# Altium PCB Karta_ILS.PCBDOC (part 7 of 9)
Units mm, origin at the board's own origin, x right, y up, seen from the top; angles counter-clockwise.
Board outline 70 x 83.2 mm, 6 copper layers (TopLayer, Layer 1, Layer 2, Layer 3, Layer 4, Bottom Layer), stack 0.914 mm thick; 406 components, 271 nets, 1327 pads, 719 vias.
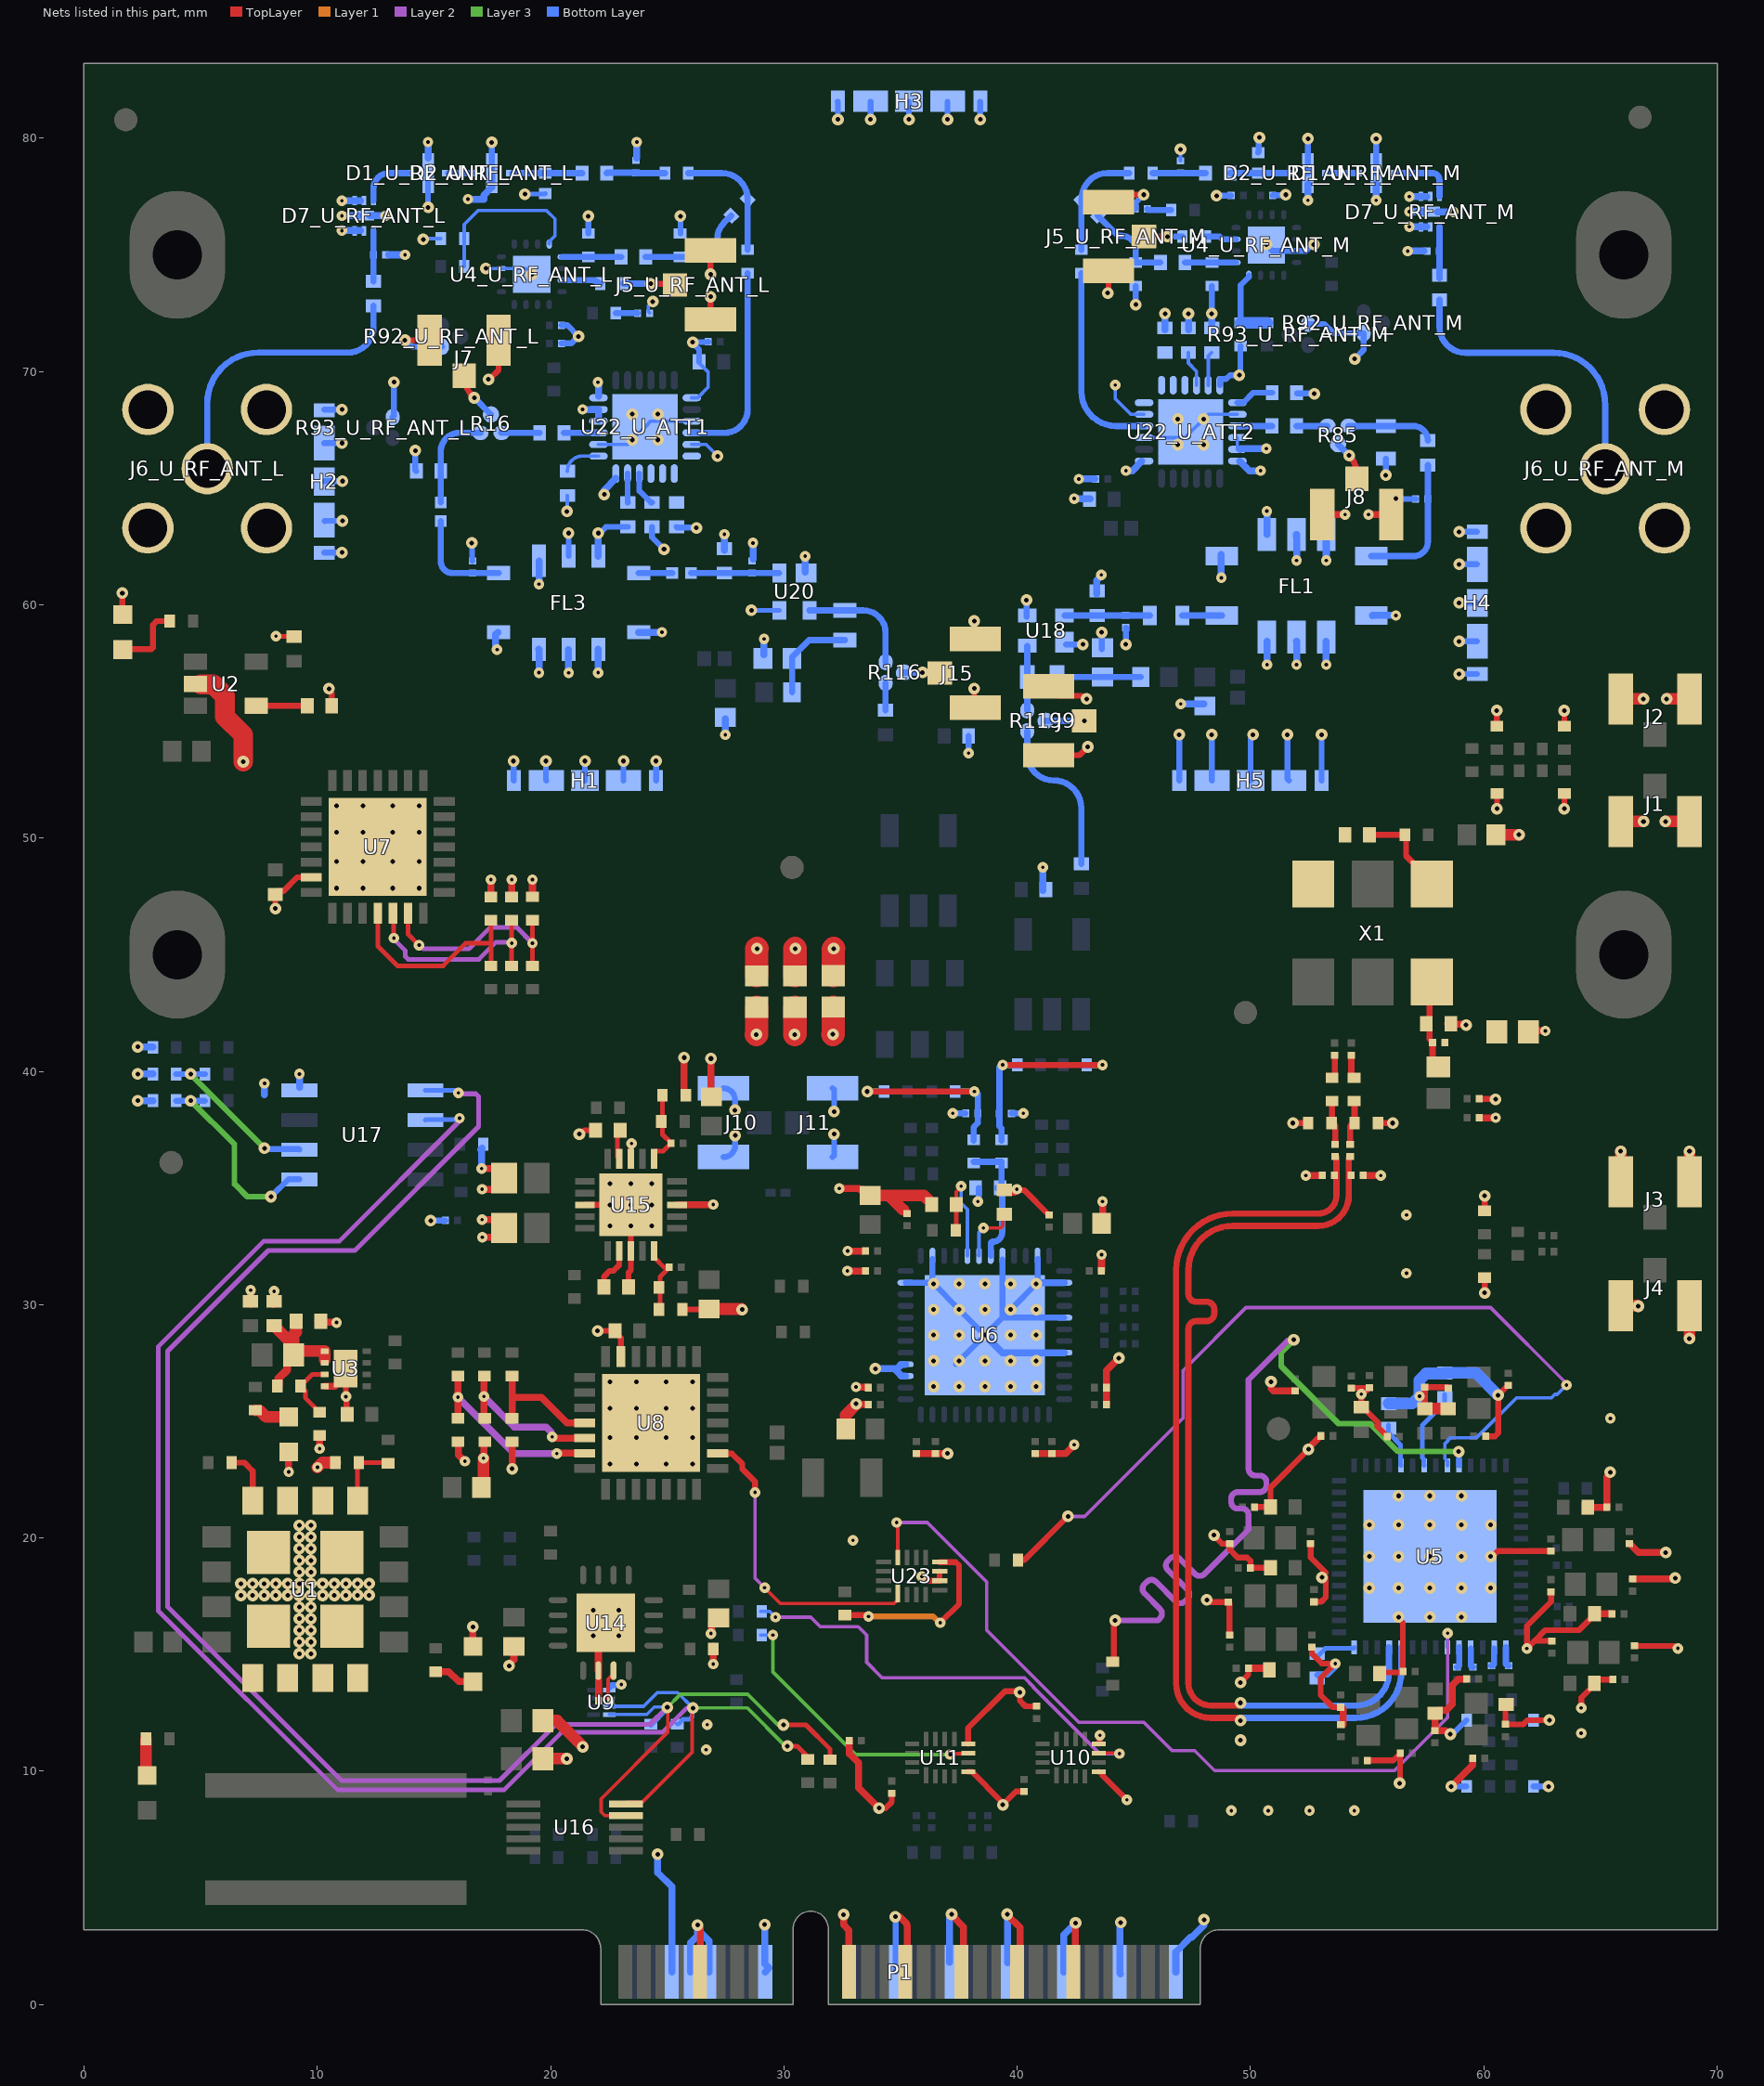
[diagram p8: the nets of this part, all layers, seen from the top]

## Via types
v1: diameter 0.5, hole 0.2, TopLayer to Bottom Layer, tented both sides, 456 vias
v2: diameter 0.45, hole 0.15, TopLayer to Bottom Layer, tented both sides, 237 vias
v3: diameter 0.45, hole 0.15, TopLayer to Bottom Layer, 23 vias
v4: diameter 0.5, hole 0.2, TopLayer to Bottom Layer, 3 vias

## Nets (pads, with @x,y where several pads share a name; then routed paths per layer and width w, separated by ;. In a path a pad name is that pad's centre, name@x,y a point inside that pad or via, vN(x,y) a via of type N, cw(c..) or ccw(c..) an arc to the next point about the centre after c; other vN are vias at no path point) (continued)
GND: C2.1 C6.1 C7.1 C8.1 C9.1 C14.2 C15.2 C35.1 C36.1 C37.1 C38.2 C39.2 C45.1 C62.1 C65.1 C66.1 C67.1 C68.1 C70.2 C71.2 C73.1 C74.1 C75.1 C76.1 C77.1 C78.1 C79.1 C80.1 C81.1 C82.1 C83.1 C84.1 C85.1 C86.1 C87.1 C88.1 C89.1 C90.1 C91.1 C92.2 C93.1 C94.1 C95.1 C96.1 C97.1 C98.1 C99.1 C100.1 C101.1 C102.1 C103.1 C104.1 C105.1 C106.1 C107.1 C108.1 C109.1 C110.1 C113.1 C114.1 C115.1 C116.1 C117.1 C118.1 C119.1 C120.1 C121.1 C122.1 C123.1 C124.1 C125.1 C126.1 C127.1 C128.1 C129.1 C131.1 C132.1 C133.1 C134.1 C135.1 C136.1 C137.1 C138.1 C139.1 C140.1 C141.1 C143.1 C144.1 C145.1 C146.1 C147.1 C148.1 C149.1 C150.1 C151.1 C152.1 C154.1 C179.1 D9.2 D12.2 FB15.2 FB30.2 FB31.2 FB32.1 FB33.1 FB34.1 J1.1 J1.3 J2.1 J2.3 J3.1 J3.3 J4.1 J4.3 J10.1 J10.3 J11.1 J11.3 P1.6 P1.8 P1.9 P1.10 P1.16 P1.17 P1.22 P1.23 P1.28 P1.29 P1.34 P1.35 P1.40 P1.41 P1.46 P1.52 R4.1 R7.1 R19.2 R23.1 R25.1 R26.1 R28.2 R29.2 R32.1 R33.1 R37.2 R38.2 R40.1 R42.2 R60.1 R61.1 R62.1 R72.1 R73.1 R74.1 R77.1 R79.1 R99.1 R101.1 R103.2 R114.1 R115.1 U1.5 U1.6 U1.7 U1.8 U1.14 U1.15 U1.EP U2.2 U3.4 U3.9 U5.57 U6.2 U6.8 U6.11 U6.14 U6.17 U6.20 U6.39 U6.40 U6.47 U6.49 U7.6 U7.29 U8.6 U8.29 U9.1 U10.5 U10.8 U11.5 U11.8 U14.6 U14.17 U15.3 U15.8 U15.13 U15.18 U15.21 U17.4 U23.6 U23.7 | length 256.4
  TopLayer w0.25: v1(8.203,46.982) C68.1@8.203,47.582 8.353,47.732 8.559,47.732 9.147,48.32 U7.6@9.744,48.32 ; U3.9@11.229,26.963 v2(11.229,26.059) 11.26,26.028 11.26,25.33 C6.1@11.29,25.299 ; v1(21.233,37.311) 21.3,37.311 21.465,37.475 C152.1@21.928,37.475 ; U15.3@21.47,34.279 v1(22.545,34.279) v1(23.445,34.279) v1(23.445,33.379) U15.8@23.445,32.304 23.445,31.482 23.341,31.377 C151.1@23.341,30.764 ; v1(22.016,28.876) C67.1@22.76,28.876 22.76,28.826 23.01,28.576 U8.6@23.01,27.779 ; U15.18@23.445,36.254 23.445,36.882 v2(23.47,36.906) ; R103.2@25.646,29.791 26.764,29.791 C141.1@26.788,29.815 ; v1(34.08,8.417) 34.36,8.417 34.625,8.683 C14.2@34.625,9.059 ; v2(35.913,18.348) 35.967,18.348 36.15,18.164 U23.6@36.677,18.164 U23.7@36.677,18.564 ; U11.5@37.9,9.979 38.05,9.979 39.334,8.695 39.334,8.61 39.429,8.61 39.949,9.13 C70.2@40.287,9.13 ; U11.8@37.9,11.179 37.9,11.85 39.479,13.429 40.111,13.429 40.111,13.026 40.353,12.784 C71.2@40.84,12.784 ; C74.1@39.449,34.785 39.819,34.785 ccw(c39.819,34.947) v2(39.981,34.947) 40.019,34.909 40.296,34.909 41.357,33.848 C77.1@41.367,33.848 ; U10.5@43.495,9.979 43.52,9.954 43.67,9.954 43.67,9.804 44.699,8.776 v2(44.702,8.776) ; U10.8@43.497,11.179 43.522,11.204 43.522,11.513 v2(43.548,11.539) ; v1(48.131,17.346) 48.199,17.346 48.295,17.25 C125.1@49.053,17.25 49.063,17.25 49.099,17.214 C118.1@49.099,15.836 ; v1(48.437,20.118) 48.437,20.089 48.777,19.749 C135.1@49.112,19.749 49.112,19.499 49.447,19.164 49.853,19.164 49.999,19.018 C126.1@49.999,18.718 C128.1@50.858,18.718 ; v1(49.57,13.806) 49.907,14.142 C117.1@49.907,14.414 ; C136.1@50.174,21.323 C138.1@50.863,21.323 50.863,22.174 v1(52.488,23.8) ; v1(51.817,37.783) R19.2@52.462,37.783 ; C137.1@52.576,19.749 52.576,19.16 53.23,18.506 53.064,18.341 v1(53.064,18.312) ; C119.1@52.634,15.316 52.634,15.032 53.05,14.616 v2(53.632,14.616) 53.006,13.989 53.006,13.262 53.526,12.742 C99.1@53.864,12.742 ; C127.1@52.719,17.259 53.028,17.259 53.23,17.461 v1@53.23,18.312 ; C106.1@54.314,26.428 54.319,26.432 C102.1@55.077,26.432 ; C97.1@55.015,10.461 56.126,10.461 C148.1@56.408,10.743 ; C102.1@55.091,26.436 55.081,26.436 C102.1@55.077,26.432 ; R23.1@55.452,37.783 R23.1@55.463,37.783 v1(56.097,37.783) ; C100.1@55.64,14.29 55.64,14.288 55.69,14.238 56.509,14.238 56.534,14.263 C149.1@56.534,14.273 56.534,16.347 56.343,16.539 v1(56.343,16.606) ; C103.1@55.864,24.342 55.864,24.352 55.44,24.776 55.44,24.966 54.804,25.603 C108.1@54.754,25.603 54.754,26.109 C102.1@55.077,26.432 ; v1(56.391,9.485) 56.408,9.502 C148.1@56.408,10.743 ; C148.1@56.424,10.769 56.408,10.753 C148.1@56.408,10.743 ; C104.1@57.471,25.54 C101.1@57.471,26.457 58.447,26.457 58.474,26.429 C94.1@58.484,26.429 ; C110.1@59.798,38.836 59.816,38.818 60.489,38.818 v1(60.507,38.8) ; v1(60.037,30.508) R42.2@60.037,31.153 ; R40.1@60.037,34.016 v1(60.037,34.662) ; C95.1@60.086,24.355 60.474,24.355 60.62,24.501 60.62,26.117 v1(60.615,26.122) 61.029,26.536 C93.1@61.039,26.536 ; v1(60.293,19.206) 60.36,19.206 60.594,19.44 C123.1@62.884,19.44 ; R29.2@60.556,54.822 v1(60.556,55.467) ; v1(60.567,51.255) R26.1@60.567,51.9 ; C116.1@60.962,12.865 60.93,12.834 C113.1@60.93,12.008 61.694,12.008 61.874,12.189 v1(62.812,12.189) ; C133.1@62.884,17.694 62.884,17.274 61.847,16.237 v2(61.847,15.259) 62.172,15.584 62.173,15.584 ; C145.1@62.911,15.584 62.173,15.584 ; v1(63.451,51.255) R25.1@63.451,51.9 ; R28.2@63.451,54.815 v1(63.451,55.46) ; v2(64.175,12.714) 64.175,13.151 64.737,13.713 C146.1@64.737,13.763 64.737,13.782 64.887,13.932 C144.1@65.528,13.932 ; C134.1@64.744,16.751 64.744,16.701 64.091,16.048 62.637,16.048 62.173,15.584 ; C143.1@66.457,15.373 68.157,15.373 68.265,15.265 v2(68.319,15.265)
  TopLayer w0.3: C9.1@7.134,30.01 7.14,30.015 7.14,30.615 v2(7.145,30.621) ; C8.1@8.152,30.01 v2@8.152,30.574 ; v2(8.776,22.829) D12.2@8.776,23.689 ; C7.1@10.016,29.282 10.045,29.252 10.809,29.252 v2(10.828,29.233) ; v2(10.102,23.827) R7.1@10.102,24.389 R7.1@10.102,24.439 ; U3.4@10.316,26.507 10.758,26.507 10.858,26.607 10.866,26.607 11.216,26.957 U3.9@11.216,27.257 ; R74.1@16.047,24.102 16.047,23.566 v2(16.324,23.289) ; D9.2@16.674,15.344 v1(16.674,16.194) ; v2(17.041,35.829) C140.1@17.605,35.829 ; v2(17.061,33.648) C139.1@17.625,33.647 ; v2@17.061,34.946 C140.1@17.625,34.946 ; v2(17.074,32.886) C139.1@17.638,32.885 ; v2(17.12,23.414) 17.148,23.443 17.148,24.073 R73.1@17.184,24.108 ; R60.1@17.445,47.425 R60.1@17.445,47.475 v2(17.445,48.222) ; v1(18.227,14.52) 18.227,14.574 18.427,14.774 C91.1@18.427,15.354 ; R61.1@18.334,47.425 R61.1@18.334,47.475 v2(18.334,48.222) ; v1@18.35,22.968 R72.1@18.35,24.122 ; R62.1@19.223,47.425 R62.1@19.223,47.482 v2(19.223,48.222) ; C92.2@22.063,13.023 22.063,14.294 U14.6@22.048,14.309 22.048,16.034 U14.17@22.373,16.359 ; U15.13@25.42,34.279 25.425,34.284 26.965,34.284 v2(26.969,34.288) ; v1(25.725,40.588) 25.725,39.049 R101.1@25.795,38.978 ; v1(26.298,3.409) 26.423,3.285 26.423,1.423 P1.9@26.4,1.4 ; v2(26.873,15.901) 26.873,15.942 26.903,15.972 26.903,16.353 C75.1@27.194,16.644 ; v1(26.873,40.548) 26.873,38.919 C129.1@26.892,38.9 ; v2(26.969,14.592) R99.1@26.969,15.353 ; v2(32.371,34.976) 33.224,34.976 33.272,34.928 33.405,34.928 33.571,34.762 C87.1@33.571,34.629 ; v1(32.557,3.855) 32.557,3.417 32.786,3.187 P1.17@32.786,1.4 ; v2(32.721,31.442) C84.1@33.407,31.442 ; v2(32.732,32.3) C79.1@33.418,32.3 ; C15.2@32.807,11.319 32.807,10.754 33.199,10.361 33.199,9.298 v1(34.08,8.417) ; v2(33.088,26.474) 33.109,26.452 33.609,26.452 C83.1@33.609,26.442 ; v1@33.114,25.733 33.609,25.733 C81.1@33.609,25.723 ; v1(34.774,3.76) 34.971,3.76 35.253,3.478 cw(c34.981,3.353) 35.281,3.353 P1.23@35.281,1.407 ; C90.1@35.677,23.617 C179.1@36.492,23.617 v1(37.012,23.617) ; v1(37.191,3.869) 37.191,3.832 37.693,3.33 P1.29@37.693,1.408 ; v1(39.569,3.868) 39.569,3.848 40.12,3.298 P1.35@40.12,1.415 ; C89.1@40.779,23.617 C88.1@41.492,23.617 42.07,23.617 v2(42.445,23.992) ; P1.41@42.488,1.422 42.488,3.479 v1(42.502,3.493) ; C78.1@43.616,31.444 v2(43.616,32.139) ; C76.1@43.658,33.532 v2(43.658,34.419) ; C80.1@43.832,25.723 C85.1@43.832,26.442 43.832,27.178 v1(44.362,27.708) ; C117.1@49.907,14.414 C120.1@50.669,14.414 ; C120.1@50.809,14.294 C120.1@50.809,14.344 ; v1(50.879,26.696) 50.896,26.678 50.896,26.4 50.996,26.301 C105.1@51.913,26.301 ; v2(52.375,35.536) C39.2@53.073,35.536 ; v1(52.488,23.8) 52.488,23.845 53.006,24.362 53.016,24.362 C107.1@53.016,24.372 ; C98.1@53.978,11.994 C99.1@53.978,12.674 ; C45.1@54.833,35.536 v2(55.584,35.536) ; v1(58.561,11.589) 58.507,11.589 58.351,11.745 C147.1@57.909,11.745 C150.1@57.909,12.481 58.034,12.606 58.384,12.606 58.644,12.867 58.644,13.683 58.911,13.95 C115.1@59.257,13.95 ; v1(58.605,9.347) 59.517,10.259 C114.1@59.517,10.557 ; C109.1@59.821,38.01 v2(60.507,38.01) ; FB15.2@61.95,41.735 v2(62.636,41.735) ; C124.1@64.456,21.317 C121.1@65.278,21.317 ; C134.1@64.744,16.751 C131.1@65.489,16.751 ; C121.1@65.278,21.31 C121.1@65.278,21.317 ; v1(65.422,22.819) 65.422,22.765 65.278,22.621 C121.1@65.278,21.317 ; C122.1@66.24,19.749 66.25,19.749 66.622,19.378 v1(67.8,19.378) ; C132.1@66.373,18.237 68.165,18.237 v1(68.208,18.28)
  TopLayer w0.5: v2(10.008,23.026) 10.211,23.229 R4.1@10.778,23.229 ; C2.1@17.028,22.166 17.12,22.257 v2(17.12,23.414) ; FB30.2@19.675,10.536 20.693,10.536 v1(20.696,10.533) ; FB31.2@19.675,12.167 20.278,12.167 21.376,11.069 v1(21.376,11.05) ; C141.1@26.788,29.815 28.192,29.815 v1(28.215,29.792) ; C86.1@32.649,24.663 32.649,25.268 v1@33.114,25.733 ; C87.1@33.705,34.678 34.508,34.678 ; 35.129,34.057 34.508,34.678 ; C73.1@36.338,34.288 36.313,34.313 36.313,34.363 35.997,34.679 34.509,34.679 ; C104.1@57.471,25.54 C96.1@58.473,25.54 ; C38.2@60.519,50.14 v1(61.509,50.14) ; J4.3@65.865,29.953 66.597,29.953 v1(66.617,29.933) ; J3.1@65.866,34.77 v1@65.866,36.572 ; J2.1@65.953,55.96 v1(66.84,55.96) ; J1.3@65.959,50.708 v1(66.846,50.708) ; v1(67.789,50.708) J1.1@68.677,50.708 ; v1(67.838,55.96) J2.3@68.725,55.96 ; v1(68.815,28.544) J4.1@68.815,29.952 ; J3.3@68.815,34.77 v1(68.815,36.572)
  TopLayer w0.85: U2.2@5.014,56.589 5.016,56.587 5.546,56.587 6.044,56.089 6.044,55.205 6.826,54.422 v1(6.826,53.271)
  TopLayer w1: v1(28.821,41.577) 28.836,41.591 FB34.1@28.836,42.745 ; v1(30.462,41.577) 30.476,41.591 FB33.1@30.476,42.745 ; v1(32.099,41.584) 32.114,41.598 FB32.1@32.114,42.752
  Bottom Layer w0.25: v1(14.858,33.603) 14.861,33.606 15.485,33.606 C154.1@15.488,33.609 ; U9.1@22.514,13.57 22.629,13.685 22.997,13.685 v2(23.029,13.716) ; J10.3@27.415,36.325 ccw(c27.415,36.82) 27.91,36.82 v1(27.91,37.25) ; J10.1@27.415,39.275 cw(c27.415,38.787) 27.903,38.787 v1(27.903,38.335) ; J11.1@32.088,36.325 32.153,36.39 v1(32.153,37.311) ; J11.3@32.088,39.275 32.153,39.21 v1(32.153,38.273) ; v1(34.774,3.76) 34.787,3.747 34.787,1.413 P1.22@34.8,1.4 ; U6.47@35.217,30.942 U6.49@36.367,30.942 ; U6.2@36.367,31.967 U6.49@36.367,30.942 ; v2(37.236,38.198) C62.1@37.791,38.198 ; U6.49@37.367,27.442 v1(37.517,27.592) v1(38.617,28.692) ; v2(38.318,34.419) ccw(c38.318,34.454) 38.353,34.454 C65.1@38.353,35.004 ; U6.8@39.367,31.93 U6.49@39.367,29.442 ; C66.1@39.757,38.196 39.759,38.198 40.263,38.198 v2(40.265,38.2) ; U6.11@40.88,31.96 40.88,30.955 v1(39.717,29.792) U6.49@39.367,29.442 ; U6.17@42.017,29.442 U6.49@39.367,29.442 ; C35.1@52.861,14.129 52.876,14.144 53.305,14.144 53.632,14.471 v2(53.632,14.616) ; v1(58.605,9.347) R37.2@59.251,9.347 ; v1@58.736,11.665 R38.2@59.26,12.189 ; R32.1@62.13,9.347 v1(62.776,9.347) ; R33.1@62.166,12.189 v1(62.812,12.189) ; U6.49@36.367,30.942 v1(36.417,30.892) v1(37.517,29.792) v1(38.617,28.692) ; v1(38.617,28.692) U6.49@39.367,29.442
  Bottom Layer w0.3: v1(2.303,38.743) R77.1@2.954,38.743 ; v1(2.303,39.886) R79.1@2.954,39.886 ; v1(2.303,41.055) R114.1@2.954,41.055 ; 7.739,38.995 v2(7.739,39.484) ; U17.4@9.237,39.322 v2(9.237,39.886) ; v2(17.041,35.829) 17.041,36.612 17.007,36.647 R115.1@17.06,36.7 ; v1(24.59,6.444) 24.59,5.659 25.2,5.049 P1.6@25.2,1.4 ; P1.8@26,1.4 26,2.638 26.298,2.936 v1(26.298,3.409) 26.298,3.23 26.8,2.728 P1.10@26.8,1.4 ; v1(29.177,3.423) 29.177,1.755 29.366,1.566 P1.16@29.2,1.4 ; v1(33.919,27.257) 34.728,27.257 ; U6.39@35.217,26.942 35.042,26.942 34.728,27.257 ; U6.40@35.217,27.442 35.042,27.442 34.856,27.257 34.728,27.257 ; P1.28@37.107,1.803 37.107,3.785 v1(37.191,3.869) ; v1(38.617,28.692) 39.367,27.942 U6.20@42.017,27.942 ; v1(39.569,3.868) 39.583,3.854 P1.34@39.583,1.796 ; U6.49@40.892,30.942 U6.14@42.017,30.942 ; P1.40@42,1.4 42,2.991 v1(42.502,3.493) ; P1.46@44.427,1.32 44.403,1.344 44.403,3.476 v1(44.439,3.512) ; P1.52@46.8,1.4 46.8,2.25 47.433,2.883 47.481,2.883 48.006,3.408 v1(48.006,3.632)
  Bottom Layer w0.5: C37.1@55.918,25.757 56.929,25.757 v2(57.244,26.071) 57.244,26.768 57.524,27.048 58.349,27.048 C36.1@58.326,27.072 59.665,27.072 v1(60.615,26.122)
  other v1: 39.381,8.563 49.573,11.329 40.111,13.381 9.228,15.038 9.728,15.038 9.228,15.538 9.728,15.538 21.823,15.809 22.923,15.809 9.228,16.038 9.728,16.038 9.228,16.538 9.728,16.538 57.693,16.606 59.043,16.606 21.823,16.909 22.923,16.909 9.229,17.039 9.729,17.039 6.729,17.538 7.229,17.538 7.729,17.538 8.229,17.538 8.729,17.539 9.229,17.539 9.729,17.539 10.229,17.539 10.729,17.539 11.229,17.539 11.728,17.539 12.228,17.54 55.093,17.856 56.343,17.856 57.693,17.856 59.043,17.856 60.293,17.856 6.729,18.038 7.229,18.038 7.729,18.038 8.229,18.038 8.729,18.039 9.229,18.039 9.729,18.039 10.229,18.039 10.729,18.039 11.229,18.039 11.728,18.039 12.228,18.04 9.229,18.539 9.729,18.539 9.228,19.039 9.728,19.039 55.093,19.206 56.343,19.206 57.693,19.206 59.043,19.206 9.228,19.539 9.728,19.539 9.228,20.039 9.728,20.039 9.228,20.539 9.728,20.539 55.093,20.556 56.343,20.556 57.693,20.556 59.043,20.556 60.293,20.556 56.343,21.806 57.693,21.806 59.043,21.806 18.349,22.968 22.54,23.159 23.675,23.159 24.945,23.159 26.08,23.159 22.54,24.294 23.675,24.294 24.945,24.294 26.08,24.294 22.54,25.564 23.675,25.564 24.945,25.564 26.08,25.564 33.094,25.754 36.417,26.492 37.517,26.492 38.617,26.492 39.717,26.492 40.817,26.492 22.54,26.699 23.675,26.699 24.945,26.699 26.08,26.699 36.417,27.592 38.617,27.592 39.717,27.592 40.817,27.592 36.417,28.692 37.517,28.692 39.717,28.692 40.817,28.692 36.417,29.792 38.617,29.792 40.817,29.792 37.517,30.892 38.617,30.892 39.717,30.892 40.817,30.892 22.545,33.379 24.345,33.379 24.345,34.279 22.545,35.179 23.445,35.179 24.345,35.179 65.866,36.572 10.824,47.85 11.959,47.85 13.229,47.85 14.363,47.85 10.824,48.985 11.959,48.985 13.229,48.985 14.363,48.985 10.824,50.255 11.959,50.255 13.229,50.255 14.363,50.255 10.824,51.39 11.959,51.39 13.229,51.39 14.363,51.39
  other v2: 49.177,8.31 50.757,8.31 52.528,8.31 54.455,8.31 26.668,10.926 64.175,11.63 26.716,11.995 32.96,19.899 65.422,25.123 54.746,26.167 8.153,30.574 56.684,31.348 56.684,33.848 17.061,34.947
GND_ATT_U_ATT1: C4.1 C5.1 C11_U_RF_ANT_L.1 C11_U_RF_ANT_M.1 C12_U_RF_ANT_L.2 C12_U_RF_ANT_M.2 C13_U_RF_ANT_L.1 C13_U_RF_ANT_M.1 C48.1 C49.1 C156.2 C158.1 C161.2 C162.2 C163.1 C168.1 C169.1 C171.2 C172.2 C180_U_ATT1.1 C180_U_ATT2.1 C181_U_ATT1.1 C181_U_ATT2.1 C182_U_ATT1.2 C182_U_ATT2.2 C183_U_ATT1.2 C183_U_ATT2.2 C184_U_ATT1.2 C184_U_ATT2.2 C185_U_ATT1.2 C185_U_ATT2.2 C186_U_RF_ANT_L.1 C186_U_RF_ANT_M.1 C187_U_RF_ANT_L.1 C187_U_RF_ANT_M.1 C188.1 C190.1 D1_U_RF_ANT_L.2 D1_U_RF_ANT_M.2 D2_U_RF_ANT_L.2 D2_U_RF_ANT_M.2 D7_U_RF_ANT_L.2 D7_U_RF_ANT_L.3 D7_U_RF_ANT_L.4 D7_U_RF_ANT_L.5 D7_U_RF_ANT_L.7 D7_U_RF_ANT_M.2 D7_U_RF_ANT_M.3 D7_U_RF_ANT_M.4 D7_U_RF_ANT_M.5 D7_U_RF_ANT_M.7 D10.2 FB32.2 FB33.2 FB34.2 FL1.A FL1.B FL1.C FL1.E FL1.F FL1.G FL1.H FL1.K FL3.1 FL3.2 FL3.3 FL3.6 FL3.7 FL3.8 FL3.9 FL3.10 H1.1 H2.1 H3.1 H4.1 H5.1 J5_U_RF_ANT_L.1 J5_U_RF_ANT_L.3 J5_U_RF_ANT_M.1 J5_U_RF_ANT_M.3 J6_U_RF_ANT_L.MH J6_U_RF_ANT_M.MH J7.1 J7.3 J8.1 J8.3 J9.1 J9.3 J15.1 J15.3 L1_U_RF_ANT_L.1 L1_U_RF_ANT_M.1 L11.1 R80_U_RF_ANT_L.1 R80_U_RF_ANT_M.1 R83_U_RF_ANT_L.2 R83_U_RF_ANT_M.2 R89_U_RF_ANT_L.2 R89_U_RF_ANT_M.2 R92_U_RF_ANT_L.1 R92_U_RF_ANT_M.1 R93_U_RF_ANT_L.1 R93_U_RF_ANT_M.1 U4_U_RF_ANT_L.11 U4_U_RF_ANT_L.17 U4_U_RF_ANT_M.11 U4_U_RF_ANT_M.17 U18.2 U18.4 U20.2 U20.4 U22_U_ATT1.1 U22_U_ATT1.3 U22_U_ATT1.5 U22_U_ATT1.12 U22_U_ATT1.14 U22_U_ATT1.16 U22_U_ATT1.17 U22_U_ATT1.18 U22_U_ATT1.25 U22_U_ATT2.1 U22_U_ATT2.3 U22_U_ATT2.5 U22_U_ATT2.12 U22_U_ATT2.14 U22_U_ATT2.16 U22_U_ATT2.17 U22_U_ATT2.18 U22_U_ATT2.25 | length 149
  TopLayer w0.2: v2(8.226,58.65) 8.908,58.65 C4.1@9,58.559
  TopLayer w0.25: v1(1.644,60.5) 1.644,59.599 D10.2@1.664,59.578 ; v1(10.5,56.4) 10.5,56.332 10.621,56.212 C5.1@10.621,55.675 ; v1(13.758,71.338) J7.1@14.819,71.338 ; v1(17.34,69.66) 17.367,69.66 17.769,70.063 J7.3@17.769,71.338 ; J5_U_RF_ANT_L.3@26.855,72.233 v1(26.855,73.208) ; v1(26.855,74.164) J5_U_RF_ANT_L.1@26.855,75.183 ; J15.3@38.163,55.688 v1(38.163,56.41) ; J15.1@38.163,58.578 v1(38.163,59.3) ; J9.1@41.352,53.55 42.665,53.55 v1(43.025,53.91) ; J9.3@41.352,56.5 41.752,56.1 42.764,56.1 42.904,55.96 v1(42.971,55.96) ; v1@43.913,73.316 J5_U_RF_ANT_M.1@43.913,74.309 ; J5_U_RF_ANT_M.3@43.913,77.259 44.231,77.577 v1(45.418,77.577)
  TopLayer w0.3: J8.3@53.048,63.872 53.051,63.868 J8.3@53.084,63.868 v2(54.049,63.868) ; v2(55.059,63.868) J8.1@56.034,63.868 56.057,63.868 J8.1@56.06,63.865
  TopLayer w1: FB34.2@28.836,44.095 28.836,45.248 v1(28.85,45.263) ; FB33.2@30.476,44.095 30.476,45.25 v1(30.488,45.263) ; FB32.2@32.114,44.102 32.114,45.239 v1(32.137,45.263)
  Bottom Layer w0.15: v1(14.544,75.664) cw(c14.58,75.664) 14.58,75.7 R89_U_RF_ANT_L.2@15.294,75.7 ; v1(17.231,74.414) U4_U_RF_ANT_L.11@17.894,74.414 18.944,74.414 v1(19.194,74.164) ; v1(20.7,64) ccw(c20.7,64.019) 20.719,64.019 C182_U_ATT1.2@20.719,64.681 ; U22_U_ATT1.14@22.052,66.871 23.302,66.871 v1(23.502,67.071) U22_U_ATT1.25@24.052,67.621 24.302,67.871 U22_U_ATT1.3@26.052,67.871 ; C11_U_RF_ANT_L.1@24.251,72.5 24.191,72.56 24.191,72.807 v1(24.381,72.998) ; U22_U_ATT1.5@26.052,66.871 26.659,66.871 v1(27.159,66.371) ; U22_U_ATT1.1@26.052,68.871 26.302,68.871 26.75,69.32 26.75,69.986 26.37,70.366 C181_U_ATT1.1@26.37,70.416 ; v2(44.2,69.414) 44.2,68.832 44.87,68.162 U22_U_ATT2.5@45.438,68.162 ; U22_U_ATT2.3@45.438,67.162 47.188,67.162 U22_U_ATT2.25@47.438,67.412 v1(47.988,67.962) 48.188,68.162 U22_U_ATT2.14@49.438,68.162 ; C187_U_RF_ANT_M.1@47,79.025 v1(47,79.524) ; U22_U_ATT2.17@49.438,66.662 U22_U_ATT2.16@49.438,67.162
  Bottom Layer w0.2: v1(18.9,77.6) 18.912,77.612 19.761,77.612 L1_U_RF_ANT_L.1@19.774,77.625 ; v1(28.613,59.76) U20.4@29.8,59.76 ; C162.2@43.658,58.156 C162.2@43.664,58.162
  Bottom Layer w0.25: H2.1@10.3,62.231 10.303,62.234 11.06,62.234 v1(11.062,62.237) ; H2.1@10.3,66.925 10.303,66.928 11.06,66.928 v1(11.062,66.931) ; H2.1@10.3,68.365 10.303,68.368 11.06,68.368 v1(11.062,68.371) ; H2.1@10.315,63.594 10.318,63.597 11.074,63.597 v1(11.077,63.6) ; H2.1@10.315,65.294 10.318,65.297 11.074,65.297 v1(11.077,65.3) ; R93_U_RF_ANT_L.1@13.229,68.043 13.286,68.101 v1(13.286,69.541) ; v1(13.758,71.338) 13.805,71.338 14.082,71.061 R92_U_RF_ANT_L.1@15.35,71.061 ; v1(14.2,66.609) 14.2,65.776 C48.1@14.244,65.731 ; v1(14.75,77.033) D1_U_RF_ANT_L.2@14.75,78.505 ; v1(16.621,62.648) 16.636,62.633 16.636,61.895 C190.1@16.651,61.88 ; D2_U_RF_ANT_L.2@17.481,78.505 v1(17.481,79.818) ; v1(18.416,53.303) 18.416,52.479 H1.1@18.423,52.472 ; v1(19.799,53.303) 19.799,52.496 H1.1@19.823,52.472 ; C13_U_RF_ANT_L.1@20.464,71.205 20.894,71.205 21.189,71.5 21.189,71.511 20.718,71.982 C12_U_RF_ANT_L.2@20.464,71.982 ; FL3.2@20.773,62.09 v1(20.773,63.071) ; H1.1@21.473,52.472 v1(21.473,53.303) ; R83_U_RF_ANT_L.2@21.619,75.914 v1(21.619,76.658) ; v1(22.043,63.071) 22.11,63.071 22.376,63.337 C183_U_ATT1.2@23.307,63.337 ; H1.1@23.123,52.472 23.125,52.474 v1(23.125,53.303) ; C184_U_ATT1.2@24.35,63.337 24.35,62.892 v1(24.864,62.378) ; v1(24.521,53.303) 24.522,53.302 24.522,52.473 H1.1@24.523,52.472 ; C185_U_ATT1.2@25.4,63.337 25.423,63.314 26.232,63.314 v1(26.255,63.291) ; R80_U_RF_ANT_L.1@25.568,75.914 v1(25.568,76.658) ; C181_U_ATT1.1@26.37,70.416 26.37,70.93 26.095,71.205 v1(26.095,71.256) 26.103,71.263 26.743,71.263 C180_U_ATT1.1@26.75,71.271 ; H3.1@32.309,81.57 32.312,81.567 32.312,80.81 v1(32.315,80.808) ; H3.1@33.709,81.57 33.712,81.567 33.712,80.81 v1(33.715,80.808) ; H3.1@35.359,81.57 35.362,81.567 35.362,80.81 v1(35.365,80.808) ; H3.1@37.009,81.57 37.012,81.567 37.012,80.81 v1(37.015,80.808) ; v2(37.913,53.639) 37.915,53.641 C156.2@37.915,54.372 ; H3.1@38.409,81.57 38.412,81.567 38.412,80.81 v1(38.415,80.808) ; U18.4@40.4,59.478 v1(40.4,60.2) ; U18.2@42.091,58.3 v1(42.813,58.3) ; C162.2@43.622,58.098 v1(43.622,58.82) ; v1(44.659,58.3) C169.1@44.659,59.022 ; C11_U_RF_ANT_M.1@45.059,76.962 45.084,76.987 45.084,77.243 v1(45.418,77.577) ; v1(45.082,72.864) R80_U_RF_ANT_M.1@45.082,73.669 ; v1(46.944,54.435) 46.947,54.432 46.947,52.475 H5.1@46.95,52.472 ; v1(48.338,54.435) 48.338,52.484 H5.1@48.35,52.472 ; v1(48.338,72.476) 48.344,72.482 48.344,73.663 R83_U_RF_ANT_M.2@48.35,73.669 ; v1(48.543,77.534) 48.548,77.539 49.163,77.539 C13_U_RF_ANT_M.1@49.168,77.544 ; U22_U_ATT2.12@48.688,69.412 48.688,69.649 48.711,69.672 48.948,69.672 49.113,69.837 v1(49.519,69.837) 49.562,69.881 49.562,71.072 R89_U_RF_ANT_M.2@49.578,71.088 ; H5.1@50,52.472 50,54.258 50.109,54.367 v1(50.109,54.435) ; L1_U_RF_ANT_M.1@50.324,79.385 50.353,79.414 50.353,79.999 v1(50.382,80.028) ; U4_U_RF_ANT_M.17@50.678,75.419 50.928,75.169 U4_U_RF_ANT_M.11@51.978,75.169 52.387,75.169 52.662,75.444 v1(52.713,75.444) ; C12_U_RF_ANT_M.2@50.949,77.544 50.965,77.56 51.491,77.56 v1(51.507,77.577) ; v1(51.583,54.435) 51.583,52.539 H5.1@51.65,52.472 ; C182_U_ATT2.2@51.991,69.056 v1@52.713,69.056 ; R93_U_RF_ANT_M.1@52.463,72.038 53.165,72.038 53.565,71.638 R92_U_RF_ANT_M.1@54.848,71.638 54.848,70.922 v1(54.465,70.538) ; D2_U_RF_ANT_M.2@52.463,78.505 v1(52.463,79.977) ; v1(53.048,54.435) v1(53.048,54.435) 53.049,52.473 H5.1@53.05,52.472 ; D1_U_RF_ANT_M.2@55.386,78.505 v1(55.386,79.977) ; v1(55.795,65.557) 55.8,65.562 L11.1@55.8,66.265 ; v1(56.229,64.55) ccw(c56.278,64.598) 56.278,64.53 C163.1@57.08,64.53 ; v1(58.945,57.03) 58.948,57.033 59.704,57.033 H4.1@59.707,57.036 ; v1(58.945,58.43) 58.948,58.433 59.704,58.433 H4.1@59.707,58.436 ; v1(58.945,60.08) 58.948,60.083 59.704,60.083 H4.1@59.707,60.086 ; v1(58.945,61.73) 58.948,61.733 59.704,61.733 H4.1@59.707,61.736 ; v1(58.945,63.13) 58.948,63.133 59.704,63.133 H4.1@59.707,63.136
  Bottom Layer w0.3: v2(11.059,76.04) 11.859,76.04 ; v2(11.059,76.674) D7_U_RF_ANT_L.7@11.746,76.674 ; v2(11.059,77.315) 11.852,77.315 ; D7_U_RF_ANT_L.7@12.242,76.674 v2(12.928,76.674) ; C186_U_RF_ANT_L.1@13.071,75 v2(13.758,75) ; D1_U_RF_ANT_L.2@14.75,79.146 v2(14.75,79.833) ; v2(16.455,77.385) 17.141,77.385 17.141,77.565 17.481,77.905 D2_U_RF_ANT_L.2@17.481,78.505 ; v2(17.706,58.081) 17.706,58.121 17.647,58.181 17.647,58.724 FL3.10@17.737,58.814 ; FL3.9@19.499,58.09 19.503,58.086 v2(19.503,57.089) ; v2(19.503,60.881) FL3.1@19.503,61.879 ; FL3.8@20.769,58.084 20.773,58.081 v2(20.773,57.083) ; v2(21.372,68.371) U22_U_ATT1.17@22.052,68.371 U22_U_ATT1.16@22.052,67.905 ; v2(22.031,69.541) 22.052,69.541 U22_U_ATT1.18@22.052,68.935 ; FL3.7@22.039,58.09 22.043,58.086 v2(22.043,57.089) ; v1(22.043,63.071) FL3.3@22.043,62.09 22.043,62.073 FL3.3@22.046,62.07 ; v1(22.302,64.728) 22.302,64.911 U22_U_ATT1.12@22.802,65.411 ; C187_U_RF_ANT_L.1@23.695,79.146 v2(23.695,79.833) ; FL3.6@23.771,58.817 23.775,58.82 v2(24.773,58.82) ; C49.1@27.45,62.336 v2(27.45,63.022) ; v2(27.491,54.425) C171.2@27.491,55.112 ; C188.1@28.676,61.962 v2(28.676,62.648) ; C172.2@29.15,57.851 v2(29.15,58.537) ; U20.2@30.911,61.396 v2(30.911,62.082) ; C158.1@41.097,47.745 v2(41.097,48.743) ; v2(42.44,64.55) C181_U_ATT2.1@43.126,64.55 ; v2(42.64,65.393) C180_U_ATT2.1@43.326,65.393 ; C168.1@43.415,60.476 43.415,61.045 43.609,61.239 v2(43.609,61.28) ; v2(44.659,65.745) 44.944,65.745 U22_U_ATT2.1@45.345,66.147 ; C185_U_ATT2.2@46.338,71.79 C185_U_ATT2.2@46.338,71.863 v1(46.338,72.476) ; v2(47.008,55.751) C161.2@48.006,55.751 ; C184_U_ATT2.2@47.338,71.79 C184_U_ATT2.2@47.338,71.863 v1(47.338,72.476) ; C183_U_ATT2.2@48.338,71.79 C183_U_ATT2.2@48.338,71.863 v1(48.338,72.476) ; v2(48.747,61.157) FL1.E@48.747,62.155 ; U22_U_ATT2.18@49.534,66.162 49.951,65.745 v2(50.429,65.745) ; U22_U_ATT2.17@49.558,66.662 49.589,66.694 v2(50.683,66.694) ; v2(50.703,64.012) 50.703,63.014 FL1.F@50.707,63.011 ; FL1.C@50.705,58.435 50.708,58.432 v2(50.708,57.434) ; FL1.B@51.972,58.435 51.975,58.432 v2(51.975,57.434) ; FL1.G@51.972,62.901 51.975,62.898 v2(51.975,61.9) ; FL1.G@51.973,63.014 FL1.G@51.977,63.011 ; v2(52.463,77.34) D2_U_RF_ANT_M.2@52.463,78.026 ; FL1.A@53.239,58.435 53.243,58.432 v2(53.243,57.434) ; FL1.H@53.244,62.901 53.247,62.898 v2(53.247,61.9) ; FL1.H@53.243,63.014 FL1.H@53.247,63.011 ; FL1.K@55.228,59.539 55.231,59.542 v2(56.229,59.542) ; v2(55.386,77.34) D1_U_RF_ANT_M.2@55.386,78.026 ; v2(56.743,75.16) 57.429,75.16 ; v2(56.805,76.2) D7_U_RF_ANT_M.3@57.3,76.2 57.551,76.2 ; v2(56.805,76.85) D7_U_RF_ANT_M.7@57.491,76.85 ; v2(56.805,77.5) D7_U_RF_ANT_M.4@57.3,77.5 57.551,77.5 ; D7_U_RF_ANT_M.7@58.014,76.837 v2(58.7,76.837)
  other v1: 46.888,66.862 47.988,66.862 24.602,67.071 46.888,67.962 23.502,68.171 24.602,68.171 52.738,69.045 21.2,71.5 43.878,73.364 50.683,75.444
GND_VCXO: C42.1 C111.1 C112.1 FB15.1 X1.3 | length 0.8
  TopLayer w0.3: C112.1@58.453,42.044 58.483,42.014 59.214,42.014 v1(59.244,41.984)
I2C_SCL: R66.1 R71.2 U9.3 U16.5 U17.6 | length 74.3
  TopLayer w0.15: U16.5@23.227,8.594 23.302,8.669 23.924,8.669 26.069,10.814 26.069,12.68 v1(26.099,12.711)
  TopLayer w0.2: v1(30.156,11.077) 30.568,11.077 31.025,10.62 R71.2@31.025,10.454
  Layer 2 w0.2: v2(16.101,37.991) 16.101,37.871 10.953,32.724 7.71,32.724 3.181,28.195 3.181,16.885 10.871,9.195 18,9.195 20.465,11.66 24.79,11.66 25.842,12.711 v1(26.099,12.711)
  Layer 3 w0.15: v1(26.099,12.711) 28.429,12.711 30.064,11.077 v1(30.156,11.077)
  Bottom Layer w0.15: U9.3@22.514,12.781 23.988,12.781 24.573,13.366 25.444,13.366 26.069,12.742 26.069,12.711 v1(26.099,12.711)
  Bottom Layer w0.2: U17.6@14.637,37.914 14.654,37.931 16.101,37.931 v2(16.101,37.991) ; R66.1@25.429,12.019 25.479,12.019 25.679,12.219 25.951,12.219 26.069,12.337 v1@26.069,12.711
I2C_SDA: R65.1 R70.2 U9.4 U16.4 U17.5 | length 77.1
  TopLayer w0.15: U16.4@23.227,8.094 22.327,8.094 22.167,8.254 22.167,8.815 25.019,11.666 25.019,12.719 v1(25.003,12.735)
  TopLayer w0.2: v1(29.982,11.986) 30.943,11.986 31.982,10.947 R70.2@31.982,10.441
  Layer 2 w0.2: v2(16.054,39.074) 16.092,39.036 16.799,39.036 16.916,38.919 16.916,37.63 11.61,32.324 7.9,32.324 3.581,28.005 3.581,17.05 11.035,9.597 17.814,9.597 20.227,12.01 24.256,12.01 24.982,12.735 v1(25.003,12.735)
  Layer 3 w0.15: v1(25.003,12.735) 25.564,13.296 28.443,13.296 29.753,11.986 v1(29.982,11.986)
  Bottom Layer w0.15: U9.4@22.514,12.431 24.126,12.431 24.445,12.751 v1@25.019,12.751
  Bottom Layer w0.2: U17.5@14.637,39.184 14.639,39.181 16.088,39.181 16.088,39.109 v2(16.054,39.074) ; R65.1@24.3,11.969 25.003,12.673 v1(25.003,12.735)
LMK_CLKin0_N: C46.1 U5.33 | length 0.9
  Bottom Layer w0.267: C46.1@58.847,14.465 ccw(c58.847,14.56) 58.943,14.56 U5.33@58.943,15.306
LMK_CLKin0_P: C47.1 U5.32 | length 0.8
  Bottom Layer w0.267: U5.32@59.443,15.247 59.443,14.56 ccw(c59.538,14.56) C47.1@59.538,14.465
LMK_CLKin1_N: C59.1 U5.30 | length 0.8
  Bottom Layer w0.267: C59.1@60.323,14.519 ccw(c60.323,14.639) 60.443,14.639 U5.30@60.443,15.247
LMK_CLKin1_P: C54.1 U5.29 | length 0.9
  Bottom Layer w0.267: U5.29@60.943,15.306 60.943,14.639 ccw(c61.063,14.639) C54.1@61.063,14.519
LMK_CLKsel: U5.34 U23.12 | length 35.9
  TopLayer w0.15: v2(34.831,20.66) 34.877,20.615 U23.12@34.877,19.164
  Layer 2 w0.15: v2(34.831,20.66) 36.144,20.66 38.693,18.111 38.693,16.051 42.645,12.099 45.43,12.099 46.644,10.885 47.603,10.885 48.46,10.028 56.173,10.028 58.448,12.303 v2(58.448,15.913)
  Bottom Layer w0.15: U5.34@58.443,15.306 58.429,15.32 58.429,15.893 v2(58.448,15.913)
LMK_CLKsel_3V3: U8.23 U23.1 | length 13.3
  TopLayer w0.15: v2(29.177,17.864) 29.851,17.189 34.727,17.189 34.877,17.339 U23.1@34.877,17.614
  TopLayer w0.25: U8.23@27.16,23.629 27.169,23.621 27.777,23.621 28.217,23.18 28.217,22.961 28.765,22.413 v2(28.765,21.95)
  Layer 2 w0.15: v2(28.765,21.95) 28.765,18.276 v2(29.177,17.864)
LMK_OSC_IN_N: C39.1 C41.1 U5.38 | length 40.9
  TopLayer w0.268: v1(49.57,12.172) ccw(c49.454,12.172) 49.454,12.288 48.296,12.288 cw(c48.296,13.772) 46.812,13.772 46.812,31.482 cw(c49.232,31.482) 49.232,33.902 52.897,33.902 ccw(c52.897,34.693) 53.688,34.693 53.688,36.298 ccw(c53.632,36.298) C41.1@53.632,36.353
  Bottom Layer w0.268: v1(49.57,12.172) cw(c49.686,12.172) 49.686,12.288 54.517,12.288 ccw(c54.517,14.232) 56.461,14.232 U5.38@56.461,15.306
LMK_OSC_IN_P: C44.1 C45.2 U5.39 | length 40.9
  TopLayer w0.268: v1(49.57,12.932) cw(c49.454,12.932) 49.454,12.816 48.296,12.816 cw(c48.296,13.772) 47.34,13.772 47.34,28.004 47.34,28.965 cw(c47.671,28.965) 47.671,29.295 48.12,29.295 ccw(c48.12,29.626) 48.45,29.626 48.45,29.791 ccw(c48.12,29.791) 48.12,30.122 47.671,30.122 cw(c47.671,30.453) 47.34,30.453 47.34,31.482 cw(c49.232,31.482) 49.232,33.374 52.897,33.374 ccw(c52.897,34.693) 54.216,34.693 54.216,36.298 cw(c54.271,36.298) C44.1@54.271,36.353
  Bottom Layer w0.268: v1(49.57,12.932) ccw(c49.686,12.932) 49.686,12.816 54.517,12.816 ccw(c54.517,14.232) 55.933,14.232 U5.39@55.933,15.306
NetC5_2: C5.2 U2.4 | length 2.2
  TopLayer w0.25: U2.4@7.384,55.662 7.39,55.668 9.565,55.668 C5.2@9.571,55.675
NetC7_2: C7.2 C8.2 FB1.1 R6.2 U3.1 U3.2 | length 6.1
  TopLayer w0.35: R6.2@8.286,26.507 8.336,26.557 8.336,26.829 8.711,27.204 8.711,27.571 FB1.1@8.986,27.846 ; 9.101,28.825 C7.2@9.101,29.282
  TopLayer w0.5: C8.2@8.151,29.095 8.201,29.095 8.226,29.07 8.226,29.023 FB1.1@8.986,28.263 ; 9.101,28.825 8.986,28.71 FB1.1@8.986,28.263 ; 10.316,27.632 U3.1@10.316,28.007 9.147,28.007 FB1.1@8.986,27.846 FB1.1@8.986,28.263
NetC10_U_RF_ANT_L_1: C10_U_RF_ANT_L.1 R83_U_RF_ANT_L.1 U4_U_RF_ANT_L.1 | length 2.5
  Bottom Layer w0.268: U4_U_RF_ANT_L.1@20.494,74.914 R83_U_RF_ANT_L.1@21.619,74.914 C10_U_RF_ANT_L.1@23.025,74.914
NetC10_U_RF_ANT_L_2: C10_U_RF_ANT_L.2 R78_U_RF_ANT_L.2 R80_U_RF_ANT_L.2 | length 4.8
  Bottom Layer w0.268: C10_U_RF_ANT_L.2@24.075,74.914 R80_U_RF_ANT_L.2@25.546,74.914 26.622,74.914 ccw(c26.622,75.306) 26.9,75.029 ccw(c26.3,75.628) 27.148,75.628 27.148,75.689 cw(c28.104,75.689) 27.428,76.365 R78_U_RF_ANT_L.2@27.741,76.678
NetC10_U_RF_ANT_M_1: C10_U_RF_ANT_M.1 R83_U_RF_ANT_M.1 U4_U_RF_ANT_M.1 | length 2.2
  Bottom Layer w0.268: C10_U_RF_ANT_M.1@47.188,74.669 R83_U_RF_ANT_M.1@48.35,74.669 U4_U_RF_ANT_M.1@49.378,74.669
NetC10_U_RF_ANT_M_2: C10_U_RF_ANT_M.2 R78_U_RF_ANT_M.2 R80_U_RF_ANT_M.2 | length 3.9
  Bottom Layer w0.268: R78_U_RF_ANT_M.2@43.462,76.678 44.215,75.924 ccw(c44.487,76.196) 44.487,75.811 cw(c44.487,75.216) 45.082,75.216 R80_U_RF_ANT_M.2@45.082,74.669 C10_U_RF_ANT_M.2@46.138,74.669
NetC11_U_RF_ANT_L_2: C11_U_RF_ANT_L.2 R90_U_RF_ANT_L.1 | length 0.9
  Bottom Layer w0.25: R90_U_RF_ANT_L.1@22.794,72.5 C11_U_RF_ANT_L.2@23.731,72.5
NetC11_U_RF_ANT_M_2: C11_U_RF_ANT_M.2 R90_U_RF_ANT_M.1 | length 1
  Bottom Layer w0.25: C11_U_RF_ANT_M.2@45.579,76.962 45.579,76.952 45.613,76.919 R90_U_RF_ANT_M.1@46.6,76.919
NetC35_2: C35.2 U5.42 | length 1.8
  Bottom Layer w0.2: C35.2@52.861,14.909 52.861,14.914 53.212,15.265 54.423,15.265 54.443,15.285 U5.42@54.443,15.306
NetC36_2: C36.2 U5.7 | length 3.5
  Bottom Layer w0.2: U5.7@57.443,23.106 57.423,23.126 57.423,23.375 57.374,23.423 57.374,24.843 58.326,25.794 C36.2@58.326,26.157
NetC37_2: C37.2 U5.5 | length 2
  Bottom Layer w0.2: C37.2@55.918,24.842 55.918,24.5 56.433,23.985 56.433,23.116 U5.5@56.443,23.106
NetC40_1: C40.1 R21.1 | length 1
  TopLayer w0.268: R21.1@53.493,39.725 ccw(c53.493,39.843) 53.61,39.843 C40.1@53.61,40.695
NetC41_2: C41.2 R19.1 R21.2 | length 2
  TopLayer w0.268: R21.2@53.493,38.725 53.493,37.804 cw(c53.472,37.804) R19.1@53.472,37.783 cw(c53.472,37.623) 53.632,37.623 C41.2@53.632,36.873
NetC42_2: C42.2 R20.2 X1.1 | length 4.3
  TopLayer w0.25: C42.2@54.964,50.14 56.669,50.14 56.669,49.234 57.773,48.129 X1.1@57.773,48.029
NetC43_1: C43.1 R22.1 | length 1
  TopLayer w0.268: C43.1@54.323,40.695 54.323,39.845 ccw(c54.443,39.845) R22.1@54.443,39.725
NetC44_2: C44.2 R22.2 R23.2 | length 2
  TopLayer w0.268: C44.2@54.271,36.873 54.271,37.592 cw(c54.463,37.592) R23.2@54.463,37.783 54.463,38.705 ccw(c54.443,38.705) R22.2@54.443,38.725
NetC48_2: C48.2 L6.1 R16.2 | length 4.3
  Bottom Layer w0.268: L6.1@15.294,64.381 C48.2@15.294,65.731 15.294,66.577 cw(c16.086,66.577) 16.086,67.368 R16.2@16.994,67.368
NetC49_2: C49.2 C188.2 L7.2 U20.1 | length 3.8
  Bottom Layer w0.268: L7.2@26.013,61.36 C49.2@27.45,61.36 C188.2@28.643,61.36 U20.1@29.8,61.36
NetC62_2: C62.2 R46.1 R48.2 R50.2 | length 8.4
  TopLayer w0.268: v1(33.578,39.135) v2(38.163,39.136)
  Bottom Layer w0.268: v1(33.578,39.135) R46.1@34.3,39.135 ; R48.2@37.342,39.135 v2(38.163,39.136) ; R50.2@38.133,37.022 38.133,37.608 38.313,37.788 C62.2@38.313,38.2 38.313,38.986 ccw(c38.163,38.986) v2(38.163,39.136)
NetC65_2: C65.2 R50.1 R54.2 U6.7 | length 5.7
  Bottom Layer w0.268: R50.1@38.133,36.122 39.329,36.122 39.329,35.2 cw(c39.133,35.2) C65.2@39.133,35.004
  Bottom Layer w0.269: U6.7@38.867,32.092 38.867,32.608 cw(c38.956,32.608) 38.956,32.696 ccw(c38.956,33.096) 39.355,33.096 39.355,34.782 ccw(c39.133,34.782) C65.2@39.133,35.004
NetC66_2: C66.2 R52.1 R54.1 R55.2 | length 9.1
  TopLayer w0.269: v2(39.381,40.275) v2(43.658,40.275)
  Bottom Layer w0.268: R54.1@39.329,37.022 39.329,37.56 39.237,37.652 C66.2@39.237,38.196 39.237,40.13 cw(c39.381,40.13) v2(39.381,40.275)
  Bottom Layer w0.269: v2(39.381,40.275) R55.2@40.056,40.275 ; R52.1@42.93,40.275 v2(43.658,40.275)
NetC73_2: C73.2 R96.2 U6.5 | length 5.1
  TopLayer w0.15: C73.2@37.388,34.288 37.388,34.836 37.598,35.046 v2(37.598,35.074)
  TopLayer w0.2: R96.2@37.367,33.186 37.388,33.206 C73.2@37.388,34.288
  Bottom Layer w0.15: v2(37.598,35.074) 37.598,34.349 37.867,34.079 U6.5@37.867,32.092
NetC74_2: C74.2 U6.6 | length 2.7
  TopLayer w0.15: v2(38.552,33.29) 39.294,33.29 39.381,33.377 39.381,33.803 C74.2@39.449,33.87
  Bottom Layer w0.15: U6.6@38.339,32.121 U6.6@38.367,32.092 38.367,33.093 38.552,33.277 v2(38.552,33.29)
NetC92_1: C92.1 U14.7 | length 1.4
  TopLayer w0.15: C92.1@22.583,13.023 22.469,13.137 22.469,13.948 22.698,14.177 U14.7@22.698,14.309
NetC111_2: C111.2 C112.2 FB12.2 X1.6 | length 3.6
  TopLayer w0.268: C111.2@57.673,41.379 57.673,42.044 57.673,43.729 X1.6@57.773,43.829 ; C111.2@57.803,41.239 57.803,40.437 FB12.2@58.054,40.186
NetC130_1: C130.1 R100.1 R101.2 U15.16 | length 3.4
  TopLayer w0.2: U15.16@24.445,36.254 24.445,36.539 24.485,36.579 24.824,36.579 25.16,36.915 C130.1@25.16,36.925 25.16,36.935 24.796,37.299 24.796,37.855 24.796,38.929 R101.2@24.845,38.978
NetC142_1: C142.1 R102.1 R103.1 U15.10 | length 2.8
  TopLayer w0.2: U15.10@24.445,32.019 24.485,31.979 24.868,31.596 C142.1@25.086,31.596 25.086,31.586 24.696,31.196 24.696,30.74 R103.1@24.696,29.791
NetC151_2: C151.2 U15.7 | length 1.9
  TopLayer w0.25: C151.2@22.291,30.764 22.291,31.205 22.533,31.448 22.698,31.448 22.945,31.695 U15.7@22.945,32.304
NetC152_2: C152.2 U15.19 | length 1.3
  TopLayer w0.2: U15.19@22.945,36.254 22.86,36.339 22.86,37.357 C152.2@22.978,37.475
NetC159_U_RF_ANT_L_1: C159_U_RF_ANT_L.1 J6_U_RF_ANT_L.1 | length 12.7
  Bottom Layer w0.268: J6_U_RF_ANT_L.1@5.265,65.813 J6_U_RF_ANT_L.1@5.284,65.831 5.284,68.624 cw(c7.47,68.624) 7.47,70.81 11.319,70.81 ccw(c11.319,71.9) 12.408,71.9 C159_U_RF_ANT_L.1@12.408,72.814
NetC159_U_RF_ANT_L_2: C159_U_RF_ANT_L.2 C186_U_RF_ANT_L.2 D7_U_RF_ANT_L.1 | length 2.2
  Bottom Layer w0.268: C159_U_RF_ANT_L.2@12.408,73.864 C186_U_RF_ANT_L.2@12.408,75 D7_U_RF_ANT_L.1@12.408,76.024
NetC159_U_RF_ANT_M_1: C159_U_RF_ANT_M.1 J6_U_RF_ANT_M.1 | length 12.9
  Bottom Layer w0.268: C159_U_RF_ANT_M.1@58.1,73.075 58.1,71.923 ccw(c59.223,71.923) 59.223,70.8 63,70.8 cw(c63,68.6) 65.2,68.6 J6_U_RF_ANT_M.1@65.2,65.831
NetC159_U_RF_ANT_M_2: C159_U_RF_ANT_M.2 C186_U_RF_ANT_M.2 D7_U_RF_ANT_M.1 | length 2.2
  Bottom Layer w0.268: C159_U_RF_ANT_M.2@58.1,73.99 C159_U_RF_ANT_M.2@58.1,74.125 C186_U_RF_ANT_M.2@58.1,75.16 D7_U_RF_ANT_M.1@58.1,76.2
NetC160_U_RF_ANT_L_1: C160_U_RF_ANT_L.1 D2_U_RF_ANT_L.1 L1_U_RF_ANT_L.2 | length 3
  Bottom Layer w0.268: D2_U_RF_ANT_L.1@18.356,78.505 L1_U_RF_ANT_L.2@19.774,78.505 C160_U_RF_ANT_L.1@21.357,78.505
NetC160_U_RF_ANT_L_2: C160_U_RF_ANT_L.2 C187_U_RF_ANT_L.2 R8_U_RF_ANT_L.1 | length 2.5
  Bottom Layer w0.268: C160_U_RF_ANT_L.2@22.407,78.505 22.422,78.52 C187_U_RF_ANT_L.2@23.657,78.52 ; C187_U_RF_ANT_L.2@23.638,78.505 R8_U_RF_ANT_L.1@24.9,78.505
NetC160_U_RF_ANT_M_1: C160_U_RF_ANT_M.1 D2_U_RF_ANT_M.1 L1_U_RF_ANT_M.2 | length 2.5
  Bottom Layer w0.268: C160_U_RF_ANT_M.1@49.124,78.505 L1_U_RF_ANT_M.2@50.324,78.505 D2_U_RF_ANT_M.1@51.588,78.505
NetC160_U_RF_ANT_M_2: C160_U_RF_ANT_M.2 C187_U_RF_ANT_M.2 R8_U_RF_ANT_M.1 | length 2.3
  Bottom Layer w0.268: R8_U_RF_ANT_M.1@45.804,78.505 C187_U_RF_ANT_M.2@47,78.505 C160_U_RF_ANT_M.2@48.074,78.505
NetC162_1: C162.1 L9.2 R84.1 | length 3.6
  Bottom Layer w0.268: L9.2@41.705,56.906 C162.1@43.658,56.906 R84.1@45.298,56.906
NetC163_2: C163.2 C167.2 FL1.J | length 6.9
  Bottom Layer w0.268: FL1.J@55.175,62.082 56.975,62.082 ccw(c56.975,62.707) 57.6,62.707 57.6,65.365 ; C163.2@57.6,64.53 C167.2@57.6,65.987
NetC164_1: C164.1 R119.1 | length 7
  Bottom Layer w0.268: R119.1@40.43,54.575 40.43,53.603 ccw(c41.56,53.603) 41.56,52.472 cw(c41.56,51.284) 42.748,51.284 C164.1@42.748,48.89
NetC167_1: C167.1 L11.2 R85.2 | length 3.8
  Bottom Layer w0.268: R85.2@54.197,67.662 56.975,67.662 cw(c56.975,67.037) C167.1@57.6,67.037 ; L11.2@55.795,67.67 L11.2@55.8,67.665
NetC168_2: C168.2 C169.2 L10.2 U18.1 | length 3.7
  Bottom Layer w0.268: U18.1@42.03,59.539 42.03,59.542 C168.2@43.426,59.542 C169.2@44.659,59.542 L10.2@45.682,59.542
NetC172_1: C172.1 L8.2 R126.1 | length 4.1
  Bottom Layer w0.268: R126.1@30.35,56.252 C172.1@30.35,57.704 30.35,57.754 31.081,58.485 L8.2@32.615,58.485
NetC173_1: C173.1 U22_U_ATT2.15 | length 1.5
  Bottom Layer w0.268: U22_U_ATT2.15@49.438,67.662 C173.1@50.919,67.662
NetC173_2: C173.2 R85.1 | length 1.3
  Bottom Layer w0.268: C173.2@51.969,67.662 R85.1@53.297,67.662
NetC175_2: C175.2 R116.1 | length 1.2
  Bottom Layer w0.268: C175.2@34.358,55.475 R116.1@34.358,56.644
NetC178_1: C178.1 U22_U_ATT1.15 | length 1.5
  Bottom Layer w0.268: C178.1@20.579,67.371 U22_U_ATT1.15@22.052,67.371
NetC178_2: C178.2 R16.1 | length 1.6
  Bottom Layer w0.268: R16.1@17.894,67.368 17.897,67.371 C178.2@19.529,67.371
NetC182_U_ATT1_1: C182_U_ATT1.1 U22_U_ATT1.13 | length 1.7
  Bottom Layer w0.15: C182_U_ATT1.1@20.719,65.731 cw(c21.359,65.731) 21.359,66.371 U22_U_ATT1.13@22.052,66.371
NetC182_U_ATT2_1: C182_U_ATT2.1 U22_U_ATT2.13 | length 1.7
  Bottom Layer w0.25: U22_U_ATT2.13@49.438,68.662 49.688,68.662 50.115,69.089 C182_U_ATT2.1@50.928,69.089
NetC183_U_ATT1_1: C183_U_ATT1.1 U22_U_ATT1.11 | length 1.2
  Bottom Layer w0.25: U22_U_ATT1.11@23.302,65.621 23.304,65.619 23.304,64.39 C183_U_ATT1.1@23.307,64.387
NetC183_U_ATT2_1: C183_U_ATT2.1 U22_U_ATT2.11 | length 1.5
  Bottom Layer w0.15: U22_U_ATT2.11@48.188,69.412 48.188,70.663 C183_U_ATT2.1@48.338,70.813
NetC184_U_ATT1_1: C184_U_ATT1.1 U22_U_ATT1.10 | length 1.5
  Bottom Layer w0.25: U22_U_ATT1.10@23.802,65.621 23.802,64.885 24.3,64.387 C184_U_ATT1.1@24.35,64.387
NetC184_U_ATT2_1: C184_U_ATT2.1 U22_U_ATT2.10 | length 1.5
  Bottom Layer w0.15: C184_U_ATT2.1@47.338,70.813 47.338,70.36 47.688,70.01 U22_U_ATT2.10@47.688,69.412
NetC185_U_ATT1_1: C185_U_ATT1.1 U22_U_ATT1.6 U22_U_ATT1.7 U22_U_ATT1.8 U22_U_ATT1.9
NetC185_U_ATT2_1: C185_U_ATT2.1 U22_U_ATT2.6 U22_U_ATT2.7 U22_U_ATT2.8 U22_U_ATT2.9
NetC190_2: C190.2 FL3.12 L6.2 | length 4.5
  Bottom Layer w0.268: L6.2@15.294,63.581 15.294,61.86 ccw(c15.794,61.86) 15.794,61.36 C190.2@16.651,61.36 FL3.12@17.773,61.36
NetD1_U_RF_ANT_L_1: D1_U_RF_ANT_L.1 D2_U_RF_ANT_L.3 | length 1
  Bottom Layer w0.268: D1_U_RF_ANT_L.1@15.625,78.505 D2_U_RF_ANT_L.3@16.606,78.505
NetD1_U_RF_ANT_L_3: D1_U_RF_ANT_L.3 D7_U_RF_ANT_L.6 | length 2.4
  Bottom Layer w0.268: D7_U_RF_ANT_L.6@12.408,77.324 12.408,77.842 cw(c13.071,77.842) 13.071,78.505 D1_U_RF_ANT_L.3@13.875,78.505
NetD1_U_RF_ANT_M_1: D1_U_RF_ANT_M.1 D2_U_RF_ANT_M.3 | length 1.2
  Bottom Layer w0.268: D2_U_RF_ANT_M.3@53.338,78.505 D1_U_RF_ANT_M.1@54.511,78.505
NetD1_U_RF_ANT_M_3: D1_U_RF_ANT_M.3 D7_U_RF_ANT_M.6 | length 2.7
  Bottom Layer w0.268: D1_U_RF_ANT_M.3@56.261,78.505 57.8,78.505 cw(c57.8,78.205) 58.1,78.205 D7_U_RF_ANT_M.6@58.1,77.5
NetD9_1: D9.1 R120.1 | length 1.8
  TopLayer w0.3: R120.1@15.074,14.268 15.64,14.268 16.064,13.844 D9.1@16.674,13.844
NetD10_1: D10.1 R122.1 | length 3.1
  TopLayer w0.25: D10.1@1.644,58.058 1.685,58.099 2.895,58.099 2.954,58.158 2.954,59.139 3.115,59.3 R122.1@3.679,59.3
NetD11_1: D11.1 R121.1 | length 1.6
  TopLayer w0.5: R121.1@2.661,11.386 2.661,9.879 D11.1@2.715,9.825
NetD12_1: D12.1 R124.1 | length 1.5
  TopLayer w0.5: R124.1@7.364,25.475 7.52,25.475 7.807,25.189 D12.1@8.776,25.189
NetFL1_D: FL1.D L10.1 | length 1.7
  Bottom Layer w0.268: L10.1@47.082,59.542 FL1.D@48.775,59.542
NetFL3_4: FL3.4 L7.1 | length 1.4
  Bottom Layer w0.268: FL3.4@23.773,61.36 L7.1@25.213,61.36
NetJ5_U_RF_ANT_L_2: J5_U_RF_ANT_L.2 R88_U_RF_ANT_L.1 | length 2.2
  TopLayer w0.268: v1(24.291,73.758) 25.28,73.758 cw(c25.28,73.708) J5_U_RF_ANT_L.2@25.33,73.708
  Bottom Layer w0.268: R88_U_RF_ANT_L.1@23.125,73.764 v1@24.275,73.764
NetJ5_U_RF_ANT_M_2: J5_U_RF_ANT_M.2 R88_U_RF_ANT_M.1 | length 1.6
  TopLayer w0.268: J5_U_RF_ANT_M.2@45.438,75.784 v1(46.438,75.784)
  Bottom Layer w0.268: v1(46.438,75.784) R88_U_RF_ANT_M.1@47.082,75.784
NetJ7_2: J7.2 R16.3 | length 2.1
  TopLayer w0.268: J7.2@16.294,69.813 ccw(c17.511,69.813) 16.651,68.952 v1(16.732,68.871)
  Bottom Layer w0.268: v1(16.732,68.871) 16.732,68.868 R16.3@17.444,68.156
NetJ8_2: J8.2 R85.3 | length 1.8
  TopLayer w0.268: v1(54.227,66.4) cw(c53.426,65.599) 54.559,65.599 J8.2@54.559,65.393
  Bottom Layer w0.268: R85.3@53.753,66.883 v1(54.227,66.4)
NetJ9_2: J9.2 R119.3 | length 1.7
  Bottom Layer w0.268: R119.3@41.217,55.025 v1(42.877,55.025)
NetJ15_2: J15.2 R116.3 | length 1.8
  TopLayer w0.268: v1(35.942,57.099) 36.892,57.099 J15.2@36.892,57.094
  Bottom Layer w0.268: R116.3@35.146,57.094 35.942,57.094 v1(35.942,57.099)
NetL8_1: L8.1 R116.2 U20.3 | length 5.1
  Bottom Layer w0.268: U20.3@31.1,59.76 L8.1@32.615,59.76 ; L8.1@32.615,59.76 33.396,59.76 cw(c33.396,58.798) 34.358,58.798 R116.2@34.358,57.544
NetL9_1: L9.1 R119.2 U18.3 | length 2.8
  Bottom Layer w0.268: R119.2@40.43,55.475 L9.1@40.43,56.906 U18.3@40.43,58.239
NetR2_1: R2.1 R4.2 U1.13 | length 3
  TopLayer w0.2: U1.13@11.735,21.594 11.728,21.601 11.728,23.229 R2.1@13.112,23.229
NetR3_2: R3.2 U1.16 | length 2.3
  TopLayer w0.25: R3.2@6.328,23.229 6.871,23.229 7.235,22.866 U1.16@7.235,21.594
NetR5_2: R5.2 U5.9 | length 37.8
  TopLayer w0.25: R5.2@40.033,19.05 40.302,19.05 v1(42.176,20.924)
  Layer 2 w0.15: v1(42.176,20.924) 42.888,20.924 47.105,25.141 47.105,27.171 49.802,29.869 60.292,29.869 63.54,26.621 v3(63.54,26.554)
  Bottom Layer w0.15: U5.9@58.443,23.106 58.443,23.286 58.334,23.395 58.334,24.047 58.584,24.297 59.69,24.297 61.393,26 62.886,26 63.043,26.157 63.143,26.157 v3(63.54,26.554)
NetR6_1: R6.1 R7.2 U3.3 | length 2.8
  TopLayer w0.2: R6.1@9.236,26.507 R6.1@9.286,26.507 ; R7.2@10.102,25.339 R7.2@10.102,25.389 9.486,26.005 9.486,26.307 R6.1@9.286,26.507 ; U3.3@10.316,27.007 9.786,27.007 R6.1@9.286,26.507
NetR8_U_RF_ANT_L_2: R8_U_RF_ANT_L.2 R9_U_RF_ANT_L.1 R78_U_RF_ANT_L.1 | length 5.4
  Bottom Layer w0.268: R8_U_RF_ANT_L.2@25.9,78.505 27.328,78.505 cw(c27.328,77.385) R78_U_RF_ANT_L.1@28.448,77.385 R9_U_RF_ANT_L.1@28.448,75.219
NetR8_U_RF_ANT_M_2: R8_U_RF_ANT_M.2 R9_U_RF_ANT_M.1 R78_U_RF_ANT_M.1 | length 4.9
  Bottom Layer w0.268: R9_U_RF_ANT_M.1@42.754,75.219 R78_U_RF_ANT_M.1@42.754,77.385 cw(c43.874,77.385) 43.874,78.505 R8_U_RF_ANT_M.2@44.804,78.505
NetR9_U_RF_ANT_L_2: R9_U_RF_ANT_L.2 U22_U_ATT1.4 | length 8.8
  Bottom Layer w0.268: U22_U_ATT1.4@26.052,67.371 27.45,67.371 ccw(c27.45,68.37) 28.448,68.37 R9_U_RF_ANT_L.2@28.448,74.219
NetR9_U_RF_ANT_M_2: R9_U_RF_ANT_M.2 U22_U_ATT2.4 | length 8.6
  Bottom Layer w0.268: R9_U_RF_ANT_M.2@42.754,74.219 42.754,69.143 ccw(c44.235,69.143) 44.235,67.662 U22_U_ATT2.4@45.438,67.662
NetR13_1: R13.1 U11.7 | length 12
  TopLayer w0.15: v2@37.125,10.754 37.875,10.754 U11.7@37.9,10.779
  Layer 3 w0.15: v2(29.53,15.836) 29.53,14.255 33.07,10.715 v2(37.125,10.715)
  Bottom Layer w0.15: R13.1@29,15.836 v2(29.53,15.836)
NetR18_2: R18.2 U5.10 | length 37.2
  TopLayer w0.25: R18.2@44.096,14.69 44.148,14.742 44.148,16.417 v1(44.196,16.464)
  Layer 2 w0.25: v1(44.196,16.464) 46.034,16.464 46.122,16.553 ccw(c45.922,16.753) 46.122,16.953 45.455,17.62 cw(c45.655,17.82) 45.455,18.02 45.555,18.12 cw(c45.755,17.92) 45.955,18.12 46.796,17.279 ccw(c46.996,17.479) 47.196,17.279 47.296,17.379 ccw(c47.096,17.579) 47.296,17.779 46.455,18.62 cw(c46.655,18.82) 46.455,19.02 46.555,19.12 cw(c46.755,18.92) 46.955,19.12 47.622,18.453 ccw(c47.822,18.653) 48.022,18.453 49.919,20.35 49.919,20.679 49.919,20.851 49.919,20.976 ccw(c49.636,20.976) 49.636,21.259 49.454,21.259 cw(c49.454,21.542) 49.171,21.542 49.171,21.683 cw(c49.454,21.683) 49.454,21.966 50.397,21.966 ccw(c50.397,22.249) 50.68,22.249 50.68,22.39 ccw(c50.397,22.39) 50.397,22.673 50.202,22.673 cw(c50.202,22.956) 49.919,22.956 49.919,24.07 49.919,26.787 51.583,28.451 51.807,28.451 v1(51.854,28.498)
  Layer 3 w0.25: v1(51.854,28.498) 51.316,27.96 51.316,27.36 53.775,24.9 55.129,24.9 56.328,23.702 v1(58.919,23.702)
  Bottom Layer w0.25: v1(58.919,23.702) 58.938,23.683 58.938,23.111 U5.10@58.943,23.106
NetR57_2: R57.2 R60.2 U7.11 | length 9.1
  TopLayer w0.2: U7.11@12.594,46.77 12.594,45.364 13.435,44.523 15.393,44.523 16.367,45.497 17.445,45.497 ; R57.2@17.445,44.47 17.445,45.497 ; R60.2@17.445,46.525 17.445,45.497
NetR58_2: R58.2 R61.2 U7.12 | length 9.1
  TopLayer w0.2: U7.12@13.244,46.77 13.265,46.749 13.265,45.731 v2(13.286,45.71) ; R58.2@18.334,44.47 v2(18.334,45.497) R61.2@18.334,46.525
  Layer 2 w0.2: v2(13.286,45.71) 13.286,45.656 13.776,45.166 13.776,44.922 13.893,44.805 16.925,44.805 17.658,45.538 18.152,45.538 18.154,45.535 18.295,45.535 v2(18.334,45.497)
NetR59_2: R59.2 R62.2 U7.13 | length 9.2
  TopLayer w0.2: U7.13@13.894,46.77 13.894,45.879 v2(14.363,45.409) ; R59.2@19.223,44.47 v2(19.223,45.495) R62.2@19.223,46.532
  Layer 2 w0.2: v2(14.363,45.409) 14.384,45.409 14.544,45.249 16.496,45.249 17.422,46.175 18.543,46.175 v2(19.223,45.495)
NetR63_1: R63.1 R77.2 U17.1 | length 8.9
  Layer 3 w0.25: v1(4.572,38.743) 6.452,36.864 6.452,35.179 7.002,34.629 v1(8.017,34.629)
  Bottom Layer w0.25: R77.2@3.954,38.743 v1(4.572,38.743) R63.1@5.19,38.743 ; v1(8.017,34.629) 8.762,35.374 U17.1@9.237,35.374
NetR67_2: R67.2 R72.2 U8.11 | length 5.5
  TopLayer w0.3: R72.2@18.351,25.073 18.351,26.033 ; R67.2@18.351,26.992 18.351,26.033 ; U8.11@21.46,24.929 20.713,24.929 19.61,26.033 18.351,26.033
NetR68_2: R68.2 R73.2 U8.12 | length 7.1
  TopLayer w0.3: R68.2@17.162,26.992 17.174,26.98 17.145,26.95 v2(17.145,26.06) 17.145,25.115 R73.2@17.187,25.073 ; v2(20.066,24.333) 20.107,24.333 20.16,24.279 U8.12@21.46,24.279
  Layer 2 w0.3: v2(17.145,26.06) 18.447,24.758 19.612,24.758 19.815,24.758 20.037,24.536 20.037,24.362 v2(20.066,24.333)
NetR69_2: R69.2 R74.2 U8.13 | length 8.4
  TopLayer w0.3: R74.2@16.032,25.073 v2(16.032,26.033) R69.2@16.032,26.992 ; v2(20.267,23.621) 20.276,23.629 U8.13@21.46,23.629
  Layer 2 w0.3: v2(16.032,26.033) 18.444,23.621 v2(20.267,23.621)
NetR75_2: R75.2 U23.8 | length 7.9
  TopLayer w0.25: R75.2@32.61,16.689 33.568,16.689 v2(33.628,16.629) ; U23.8@36.677,18.964 37.365,18.964 37.512,18.818 37.512,17.178 v2(36.7,16.366)
  Layer 1 w0.25: v2(33.628,16.629) 36.398,16.629 36.661,16.366 v2(36.7,16.366)
  Bottom Layer w0.25: v2(33.628,16.629) v2@33.653,16.654
NetR76_1: R76.1 R79.2 U17.2 | length 7.3
  Layer 3 w0.25: v1(4.572,39.886) 4.572,39.878 7.739,36.712 v1(7.739,36.703)
  Bottom Layer w0.25: R79.2@3.954,39.886 v1(4.572,39.886) R76.1@5.19,39.886 ; v1(7.739,36.703) 7.768,36.673 9.207,36.673 U17.2@9.237,36.644
NetR86_U_RF_ANT_L_1: R86_U_RF_ANT_L.1 R89_U_RF_ANT_L.1 U4_U_RF_ANT_L.16 | length 7.3
  Bottom Layer w0.15: R86_U_RF_ANT_L.1@16.294,74.5 R89_U_RF_ANT_L.1@16.294,75.7 16.294,76.306 16.884,76.896 19.831,76.896 20.185,76.542 20.185,75.811 19.944,75.57 U4_U_RF_ANT_L.16@19.944,75.464
NetR86_U_RF_ANT_M_1: R86_U_RF_ANT_M.1 R89_U_RF_ANT_M.1 U4_U_RF_ANT_M.16 | length 3.3
  Bottom Layer w0.25: R89_U_RF_ANT_M.1@49.578,72.088 49.578,73.704 49.928,74.054 U4_U_RF_ANT_M.16@49.928,74.119
  Bottom Layer w0.5: R89_U_RF_ANT_M.1@49.578,72.088 R86_U_RF_ANT_M.1@50.708,72.088
NetR87_1: R87.1 U10.7 | length 19.5
  TopLayer w0.15: U10.7@43.495,10.779 43.503,10.787 44.351,10.787 v2(44.384,10.754)
  Layer 2 w0.15: v2(29.638,16.602) 31.151,16.602 31.559,16.194 33.185,16.194 33.544,15.835 33.544,14.674 34.208,14.01 40.31,14.01 40.696,13.624 40.696,13.599 43.541,10.754 v2(44.384,10.754)
  Bottom Layer w0.15: R87.1@29,16.852 29.388,16.852 v2(29.638,16.602)
NetR88_U_RF_ANT_L_2: R88_U_RF_ANT_L.2 U4_U_RF_ANT_L.3 | length 1.7
  Bottom Layer w0.268: U4_U_RF_ANT_L.3@20.494,73.914 21.763,73.914 cw(c21.763,73.402) R88_U_RF_ANT_L.2@22.125,73.764
NetR88_U_RF_ANT_M_2: R88_U_RF_ANT_M.2 U4_U_RF_ANT_M.3 | length 1.3
  Bottom Layer w0.268: R88_U_RF_ANT_M.2@48.082,75.784 48.68,75.784 48.795,75.669 U4_U_RF_ANT_M.3@49.378,75.669